# Altium PCB PCB1.PcbDoc (part 2 of 2)
Units mm, origin at the board's own origin, x right, y up, seen from the top; angles counter-clockwise.
Board outline 195 x 95 mm, 2 copper layers (Top Layer, Bottom Layer), stack 1.571 mm thick; 477 components, 312 nets, 1623 pads, 26 vias.
Unrouted connection lines stored in the file: 1219.
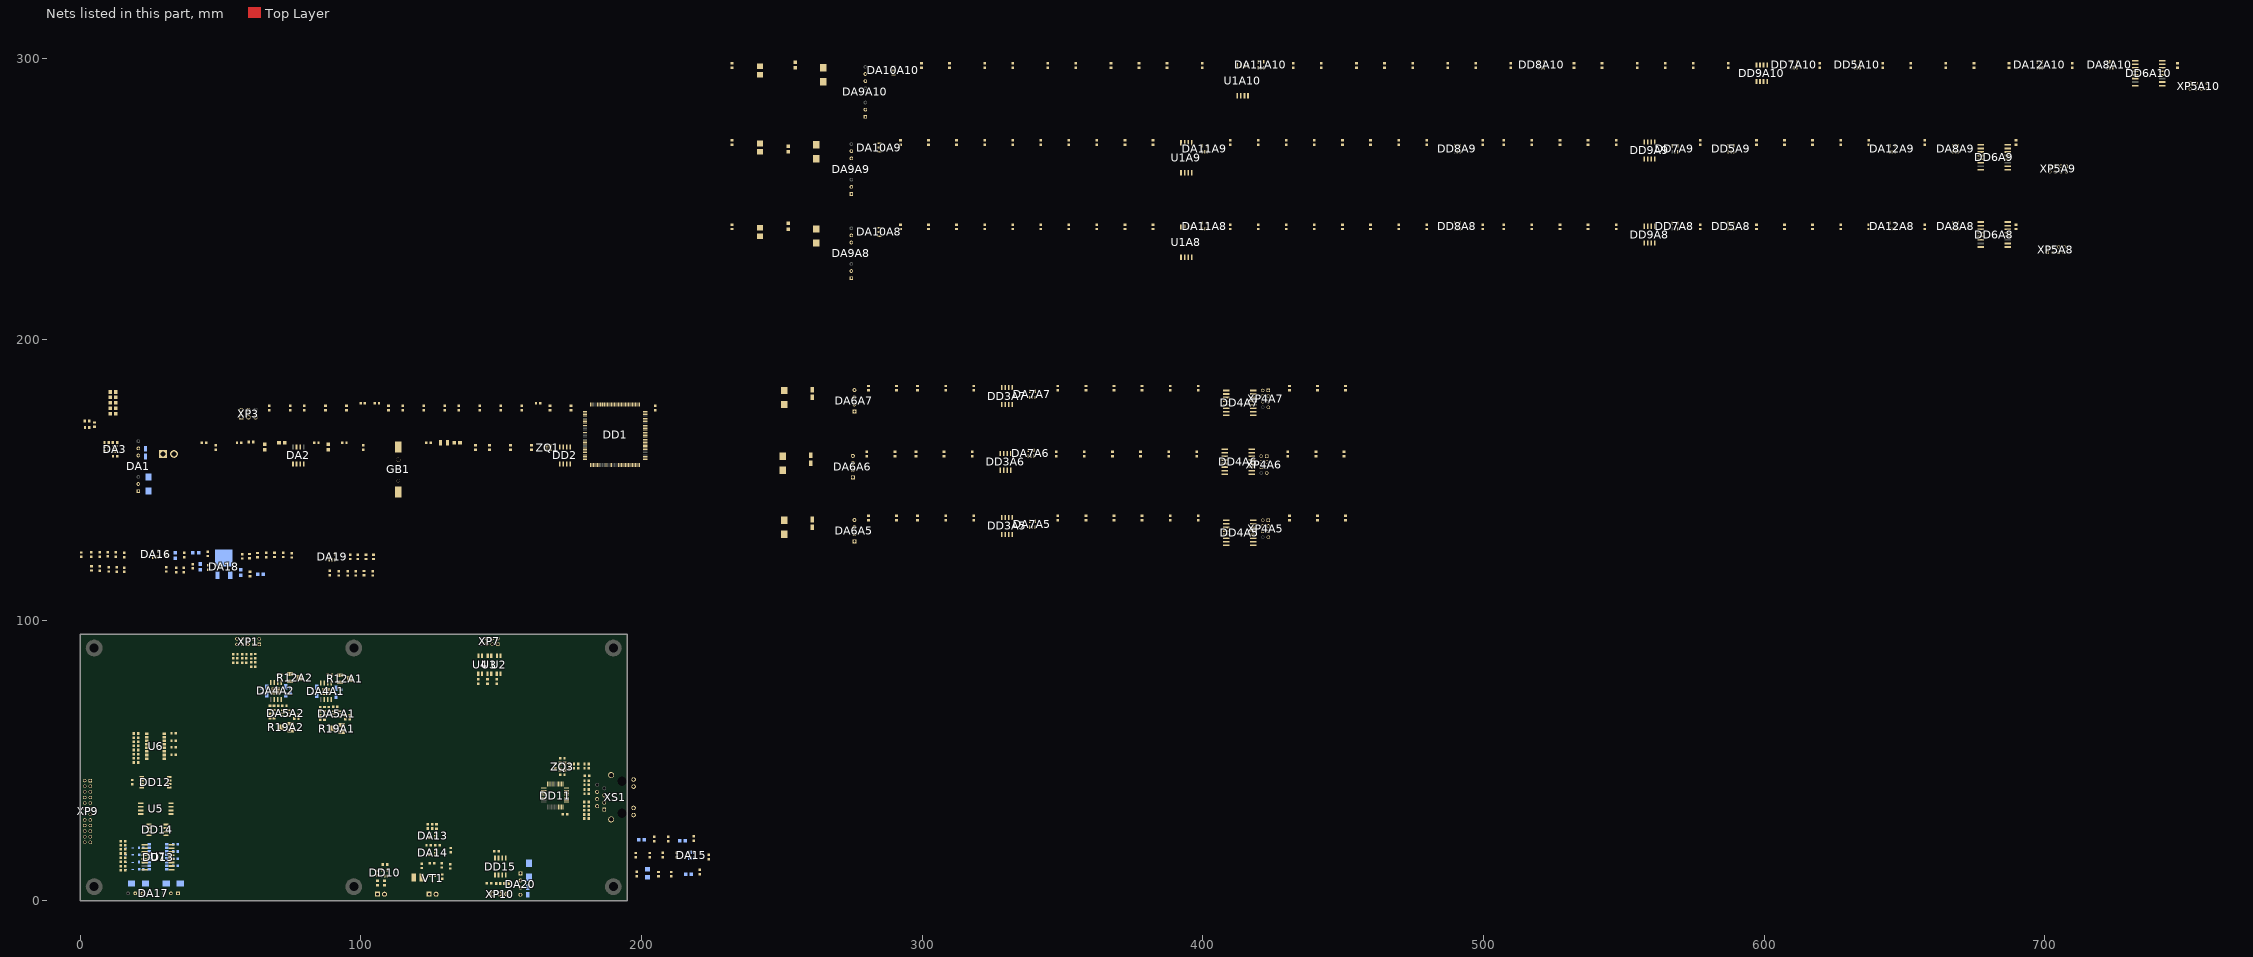
[diagram p2: the nets of this part, all layers, seen from the top]

## Part data
C1 C2 C35A1 C35A2 C38A1 C38A2 C44A5 C44A6 C44A7 C46A5 C46A6 C46A7 C52A8 C52A9 C52A10 C60A8 C60A9 C60A10 C110 C114 C119 C122: library part Capacitor_Polar
  C1 C44A5 C44A6 C44A7 C52A8 C52A9 C52A10 C110 C114 C119: Model="TECAP, 10 мкФ, 35 В, тип C, 10%"
  C2 C35A1 C35A2 C38A1 C38A2 C46A5 C46A6 C46A7 C122: Model="TECAP, 10 мкФ, 10 В, тип A, 10%"
  C60A8 C60A9 C60A10: Model="TECAP, 10 мкФ, 25 В, тип B, 10%"
C3 C4 C5 C6 C7 C8 C9 C11 C12 C13 C14 C15 C16 C18 C19 C20 C21 C22 C23 C24 C25 C26 C27 C28 C29 C30 C31 C32 C33 C34A1 C34A2 C36A1 C36A2 C37A1 C37A2 C39A1 C39A2 C40A1 C40A2 C41A1 C41A2 C42A1 C42A2 C43A3 C43A4 C45A5 C45A6 C45A7 C47A5 C47A6 C47A7 C48A5 C48A6 C48A7 C49A5 C49A6 C49A7 C50A5 C50A6 C50A7 C51A5 C51A6 C51A7 C53A8 C53A9 C53A10 C54A8 C54A9 C54A10 C55A8 C55A9 C55A10 C56A8 C56A9 C56A10 C57A8 C57A9 C57A10 C58A8 C58A9 C58A10 C59A8 C59A9 C59A10 C61A8 C61A9 C61A10 C62A8 C62A9 C62A10 C63A8 C63A9 C63A10 C64A8 C64A9 C64A10 C65A8 C65A9 C65A10 C66A8 C66A9 C66A10 C67A8 C67A9 C67A10 C68A8 C68A9 C68A10 C69A8 C69A9 C69A10 C70A8 C70A9 C70A10 C71A8 C71A9 C71A10 C72A8 C72A9 C72A10 C73A8 C73A9 C73A10 C74A8 C74A9 C74A10 C75 C76 C77 C78 C79 C80 C81 C83 C84 C85 C86 C88 C90 C91 C92 C93 C94 C95 C96 C97 C98 C99 C100 C101 C102 C103 C104 C105 C106 C107 C108 C109 C111 C112 C113 C115 C116 C117 C118 C120 C121 C123: library part Capacitor, Manufacturer=Murata
  C3 C4 C9 C12 C13 C14 C16 C19 C21 C22 C23 C24 C25 C26 C27 C28 C30 C31 C32 C33 C36A1 C36A2 C37A1 C37A2 C39A1 C39A2 C41A1 C41A2 C43A3 C43A4 C45A5 C45A6 C45A7 C47A5 C47A6 C47A7 C48A5 C48A6 C48A7 C50A5 C50A6 C50A7 C51A5 C51A6 C51A7 C53A8 C53A9 C53A10 C54A8 C54A9 C54A10 C55A8 C55A9 C55A10 C57A8 C57A9 C57A10 C61A8 C61A9 C61A10 C64A8 C64A9 C64A10 C65A8 C65A9 C65A10 C66A8 C66A9 C66A10 C67A8 C67A9 C67A10 C68A8 C68A9 C68A10 C70A8 C70A9 C70A10 C72A8 C72A9 C72A10 C73A8 C73A9 C73A10 C74A8 C74A9 C74A10 C76 C77 C80 C81 C83 C84 C85 C86 C88 C90 C91 C92 C93 C94 C95 C96 C97 C98 C100 C101 C102 C103 C105 C106 C108 C109 C112 C113 C116 C117 C118 C120 C121 C123: Model=GRM188R71H104KA93D
  C5 C6: Model=GRM188R6YA475KE15D
  C7 C58A8 C58A9 C58A10 C59A8 C59A9 C59A10 C75 C79 C115: Model=GRM188R61H105KAALD
  C8: Model=GRM188R61E106KA73D
  C11 C18: Model=GRM1885C1H180FA01D
  C15 C20 C29 C42A1 C42A2: Model=GRM188R61H225KE11D
  C34A1 C34A2 C40A1 C40A2: Model=GRM1885C1H220JA01D
  C49A5 C49A6 C49A7 C69A8 C69A9 C69A10: Model=GRM188R71H103JA01D
  C56A8 C56A9 C56A10 C62A8 C62A9 C62A10 C71A8 C71A9 C71A10 C78 C99 C104 C107: Model=GRM1885C1H101JA01D
  C63A8 C63A9 C63A10 C111: Model=GRM219R71H334KA88D
C10 C17 C82 C87 C89: library part Capacitor, Manufacturer=Yageo
  C10 C17 C87 C89: Model=CC0603CRNPO9BN8R0
  C82: Model=CC1206KKX7RDBB102
DA1 DA9A8 DA9A9 DA9A10: library part TMR3, Manufacturer="Traco Power"
  DA1: Model="TMR 6-2411"
  DA9A8 DA9A9 DA9A10: Model="TMR 2412"
DA2: library part LD1117D33, Manufacturer=STMicroelectronics, Model=LD1117D33CTR
DA3: library part LM27761, Manufacturer="Texas Instruments", Model=LM27761DSGR
DA4A1 DA4A2 DD12: Manufacturer="Analog Devices"
  DA4A1 DA4A2: Model=ADA4817-1ARDZ
  DD12: Model=ADM3050EBRIZ
DA5A1 DA5A2: library part TLV3501, Manufacturer="Texas Instruments", Model=TLV3501AIDBVR
DA6A5 DA6A6 DA6A7 DA20: library part TME, Manufacturer="Traco Power", Model="TME 2405S"
DA7A5 DA7A6 DA7A7 DA11A8 DA11A9 DA11A10 DA12A8 DA12A9 DA12A10 DA13 DA14 DA16: library part LMC7101, Manufacturer="Texas Instruments", Model=LMC7101BIM5
DA8A8 DA8A9 DA8A10: library part SN74LVC1G3157, Manufacturer="Texas Instruments", Model=SN74LVC1G3157DBV
DA10A8 DA10A9 DA10A10: library part LD2981ABU50TR, Manufacturer=STMicroelectronics, Model=L78L05ABUTR
DA15: library part TPD4S009, Manufacturer="Texas Instruments", Model=TPD4S009DBVR
DA17: library part TMR4, Manufacturer="Traco Power", Model="TMR 4-2415"
DA18: library part L78M, Manufacturer=STMicroelectronics, Model=L78M05CDT-TR
DA19: library part LM7301IM5, Manufacturer="Texas Instruments", Model=LM7301IM5X/NOPB
DD1: library part STM32F405ZG, Manufacturer=STMicroelectronics, Model=STM32F405ZGT6
DD2: library part W25Q, Manufacturer=Winbond, Model=W25Q16JVSNIQ
DD3A5 DD3A6 DD3A7 DD14 DD15: library part ADUM1100, Manufacturer="Analog Devices", Model=ADUM1100BR
DD4A5 DD4A6 DD4A7: library part ADUM1401, Manufacturer="Analog Devices", Model=ADUM1401CRW
DD5A8 DD5A9 DD5A10: library part SN74LVC1G08, Manufacturer="Texas Instruments", Model=SN74LVC1G08DBV
DD6A8 DD6A9 DD6A10 DD13: library part ADUM1400, Manufacturer="Analog Devices", Model=ADUM1400CRW
DD7A8 DD7A9 DD7A10 DD8A8 DD8A9 DD8A10 DD10: library part SN74LVC1G17, Manufacturer="Texas Instruments", Model=SN74LVC1G17DBV
DD9A8 DD9A9 DD9A10: library part ADUM1200, Manufacturer="Analog Devices", Model=ADUM1200CR
DD11: library part W5100S, Manufacturer=Wiznet, Model=W5100S-L
GB1: library part Accumulator, Manufacturer=Connfly, Model=DS1092-12-N8S
L1 L2 L3 L4 L5 L6 L7 L8: library part Inductor, Manufacturer=Murata, Model=BLM21PG221SN1D
R1 R2 R3 R4 R5 R6 R7 R8 R9 R10 R11 R13A1 R13A2 R15A1 R15A2 R16A1 R16A2 R17A1 R17A2 R18A1 R18A2 R20A3 R20A4 R21A3 R21A4 R22A5 R22A6 R22A7 R24A5 R24A6 R24A7 R25A5 R25A6 R25A7 R26A5 R26A6 R26A7 R27A5 R27A6 R27A7 R28A5 R28A6 R28A7 R29A5 R29A6 R29A7 R30A8 R30A9 R30A10 R31A8 R31A9 R31A10 R32A8 R32A9 R32A10 R33A8 R33A9 R33A10 R34A8 R34A9 R34A10 R35A8 R35A9 R35A10 R36A8 R36A9 R36A10 R37A8 R37A9 R37A10 R38A8 R38A9 R38A10 R39A8 R39A9 R39A10 R40A8 R40A9 R40A10 R41A8 R41A9 R41A10 R42A8 R42A9 R42A10 R43 R44 R45 R46 R47 R48 R49 R50 R51 R52 R53 R54 R55 R56 R57 R58 R59 R60 R61 R62 R63 R64 R65 R66 R67 R68 R69 R70 R71 R72 R73 R74 R75 R76 R77 R78 R79 R80 R81 R82 R83 R84 R85 R86 R87 R88 R89 R90 R91 R92 R93 R94 R95 R96 R97 R98 R99 R100 R101 R102 R103 R104 R105 R106 R107 R108 R113 R114 R115 R116 R117 R118 R119 R120 R121: library part Resistor, Manufacturer=Yageo
  R1 R2 R5 R113 R115: Model=RC0805FR-070RL
  R3: Model=RC0603FR-07133KL
  R4: Model=RT0603BRD0750KL
  R6 R10 R16A1 R16A2 R17A1 R17A2 R18A1 R18A2 R20A3 R20A4 R21A3 R21A4 R22A5 R22A6 R22A7 R24A5 R24A6 R24A7 R26A5 R26A6 R26A7 R27A5 R27A6 R27A7 R28A5 R28A6 R28A7 R29A5 R29A6 R29A7 R31A8 R31A9 R31A10 R32A8 R32A9 R32A10 R33A8 R33A9 R33A10 R34A8 R34A9 R34A10 R35A8 R35A9 R35A10 R36A8 R36A9 R36A10 R37A8 R37A9 R37A10 R38A8 R38A9 R38A10 R40A8 R40A9 R40A10 R42A8 R42A9 R42A10 R43 R44 R46 R48 R49 R55 R70 R71 R72 R73 R74 R75 R78 R79 R80 R81 R82 R83 R84 R89 R90 R91 R92 R93 R94 R95 R96 R99 R104 R114 R116 R117 R119 R120 R121: Model=RC0603FR-0710KL
  R7 R8 R9 R47 R51 R52 R53 R100 R101 R102 R103: Model=RC0603FR-07200RL
  R11 R13A1 R13A2 R69 R105 R106 R107 R108: Model=RC0603FR-070RL
  R15A1 R15A2: Model=RC0603FR-075K1L
  R25A5 R25A6 R25A7: Model=RC0603FR-072K4L
  R30A8 R30A9 R30A10: Model=RC0603FR-0715KL
  R39A8 R39A9 R39A10 R41A8 R41A9 R41A10 R97 R98: Model=RC0603FR-0716K5L
  R45 R68: Model=RC0603FR-0712KL
  R50: Model=RC1210FR-0710RL
  R54 R62 R65: Model=RC0603FR-071KL
  R56 R57 R58 R59: Model=RC0603FR-0749R9L
  R60 R61 R63 R64: Model=RC0603FR-073R3L
  R66: Model=RC0603FR-07300RL
  R67: Model=RC0603FR-071ML
  R76: Model=RC0603FR-0740K2L
  R77: Model=RC0603FR-07120RL
  R85 R86 R87 R88: Model=RC0603FR-07390RL
  R118: Model=RC0603FR-076K04L
R12A1 R12A2 R19A1 R19A2: library part Resistor_Variable, Manufacturer=Bourns
  R12A1 R12A2: Model=3224W-1-205E
  R19A1 R19A2: Model=3224W-1-103
R14A1 R14A2 R23A5 R23A6 R23A7 R109 R110 R111 R112: library part Resistor, Model=DNP
U1A8 U1A9 U1A10 U5: library part ACPL-C87, Manufacturer=Broadcom, Model=ACPL-C87A-500E
U2 U3 U4: library part TLP291, Manufacturer=Toshiba, Model=TLP291(GB-TP,SE
U6 U7: library part TLP281-4, Manufacturer=Toshiba, Model=TLP291-4
VD1 VD2 VD3: library part LED, Manufacturer=Kingbright
  VD1: Model=KP-2012MGC
  VD2: Model=KP-2012SYC
  VD3: Model=KP-2012EC
VD4 VD5 VD6 VD7: library part Diode_Zener, Manufacturer=Nexperia, Model=BZX384-C5V1
VT1: library part "MOSFET N-channel", Manufacturer=UMW, Model=AO3400A
XP1: library part Connector-10, Manufacturer=JST, Model=B10B-PHDSS
XP2 XP6 XP8: library part Connector-2, Manufacturer=JST
  XP2: Model=B2P-VH
  XP6 XP8: Model=B2B-EH-A
XP3: library part Connector-6, Manufacturer=Connfly, Model=PLD-6
XP4A5 XP4A6 XP4A7 XP5A8 XP5A9 XP5A10 XP7: library part Connector-8, Manufacturer=JST, Model=B8B-PHDSS
XP9: library part Connector-24, Manufacturer=JST, Model=B24B-PHDSS
XP10: library part Connector-3, Manufacturer=JST, Model=B3B-EH-A
XS1: Manufacturer=LINK-PP, Model=LPJD0012BENL
ZQ1: library part Quartz_Resonator_4-pin, Manufacturer=NDK, Model=NX2520SA-16MHZ-STD-CSW-5
ZQ2: library part Quartz_Resonator, Manufacturer=NDK, Model="NX3215SA- 32.768K-STD-MUA-8"
ZQ3: library part Quartz_Resonator_4-pin, Manufacturer=TXC, Model=7M-25.000MAAJ-T

## Free pads (board coordinates)
  round 6 hole 3.2: ""(5,5) ""(5,90) ""(97.5,5) ""(97.5,90) ""(190,5) ""(190,90)

## Via types
v1: diameter 0.6, hole 0.3, Top Layer to Bottom Layer, 26 vias

## Nets (pads, with @x,y where several pads share a name; then routed paths per layer and width w, separated by ;. In a path a pad name is that pad's centre, name@x,y a point inside that pad or via, vN(x,y) a via of type N, cw(c..) or ccw(c..) an arc to the next point about the centre after c; other vN are vias at no path point)
1V2A: C91.1 DD11.4 L5.2
1V2D: C90.1 C94.1 C96.1 C97.1 DD11.13 DD11.22 DD11.31 DD11.45 L4.2 L5.1
1V2O: C86.1 DD11.14 L4.1
+3.3V: C8.1 C9.1 C13.2 C21.2 C22.1 C23.1 C24.1 C26.2 C27.2 C28.2 C30.1 C31.2 C32.1 C33.1 C45A5.1 C45A6.1 C45A7.1 C47A5.1 C47A6.1 C47A7.1 C53A8.1 C53A9.1 C53A10.1 C54A8.1 C54A9.1 C54A10.1 C57A8.1 C57A9.1 C57A10.1 C73A8.1 C73A9.1 C73A10.1 C80.1 C83.1 C88.1 C93.1 C103.1 C106.1 C108.1 C123.1 DA2.2 DA2.3 DA2.6 DA2.7 DA8A8.5 DA8A9.5 DA8A10.5 DA15.5 DD1.17 DD1.30 DD1.39 DD1.52 DD1.62 DD1.72 DD1.84 DD1.95 DD1.108 DD1.121 DD1.131 DD1.144 DD2.3 DD2.7 DD2.8 DD3A5.1 DD3A5.3 DD3A6.1 DD3A6.3 DD3A7.1 DD3A7.3 DD4A5.10 DD4A5.16 DD4A6.10 DD4A6.16 DD4A7.10 DD4A7.16 DD5A8.5 DD5A9.5 DD5A10.5 DD6A8.1 DD6A9.1 DD6A10.1 DD9A8.8 DD9A9.8 DD9A10.8 DD10.5 DD11.24 DD11.36 DD12.1 DD13.10 DD13.16 DD14.1 DD14.3 DD15.8 L2.1 L6.1 R11.2 R22A5.1 R22A6.1 R22A7.1 R55.2 R70.2 R91.1 R92.1 R94.1 R96.1 XP3.1 XS1.9 XS1.11
+3.3VA: C12.2 C14.2 C16.1 C41A1.1 C41A2.1 C42A1.1 C42A2.1 DA5A1.4 DA5A2.4 DD1.32 DD1.33 L2.2 R19A1.3 R19A2.3 R20A3.1 R20A4.1
+3.3VA_ETH: C81.1 C92.1 C95.1 DD11.8 DD11.15 L6.2 XS1.2 XS1.5
+5V: C2.1 C4.2 C5.1 C76.1 C77.1 DA1.6 DA2.4 DA3.1 DA3.6 DA13.2 DA14.2 L1.1 XP6.1
+5V_DRVA8: C55A8.1 C64A8.1 C65A8.1 C66A8.1 C68A8.1 C70A8.1 C72A8.1 DA10A8.1 DA12A8.2 DD6A8.10 DD6A8.16 DD7A8.5 DD8A8.5 DD9A8.1 U1A8.1
+5V_DRVA9: C55A9.1 C64A9.1 C65A9.1 C66A9.1 C68A9.1 C70A9.1 C72A9.1 DA10A9.1 DA12A9.2 DD6A9.10 DD6A9.16 DD7A9.5 DD8A9.5 DD9A9.1 U1A9.1
+5V_DRVA10: C55A10.1 C64A10.1 C65A10.1 C66A10.1 C68A10.1 C70A10.1 C72A10.1 DA10A10.1 DA12A10.2 DD6A10.10 DD6A10.16 DD7A10.5 DD8A10.5 DD9A10.1 U1A10.1
+5V_FS: C120.1 C121.1 C122.1 DA20.4 DD15.1 DD15.3 XP10.2
+5V_HW: C100.1 C101.1 C112.1 C113.1 DA18.3 DD12.8 DD13.1 DD14.8 L7.1 R109.2 R110.2 R111.2 R112.2 XP9.1 XP9.2 XP9.8 XP9.10
+5V_PSA5: C46A5.1 C48A5.1 C50A5.1 C51A5.1 DA6A5.4 DA7A5.2 DD3A5.8 DD4A5.1 DD4A5.7 R27A5.1 R29A5.1
+5V_PSA6: C46A6.1 C48A6.1 C50A6.1 C51A6.1 DA6A6.4 DA7A6.2 DD3A6.8 DD4A6.1 DD4A6.7 R27A6.1 R29A6.1
+5V_PSA7: C46A7.1 C48A7.1 C50A7.1 C51A7.1 DA6A7.4 DA7A7.2 DD3A7.8 DD4A7.1 DD4A7.7 R27A7.1 R29A7.1
+5VA: C3.1 C37A1.1 C37A2.1 C38A1.1 C38A2.1 C61A8.1 C61A9.1 C61A10.1 C67A8.1 C67A9.1 C67A10.1 C102.1 C105.1 DA4A1.7 DA4A1.8 DA4A2.7 DA4A2.8 DA11A8.2 DA11A9.2 DA11A10.2 DA16.2 L1.2 U1A8.8 U1A9.8 U1A10.8 U5.8
+5VA_HW: C98.1 C117.1 L7.2 U5.1
+12V_DRVA8: C60A8.1 C63A8.2 DA9A8.6 DA10A8.3 XP5A8.1
+12V_DRVA9: C60A9.1 C63A9.2 DA9A9.6 DA10A9.3 XP5A9.1
+12V_DRVA10: C60A10.1 C63A10.2 DA9A10.6 DA10A10.3 XP5A10.1
+24V: C1.1 C44A5.1 C44A6.1 C44A7.1 C52A8.1 C52A9.1 C52A10.1 C110.1 C119.1 DA1.2 DA6A5.2 DA6A6.2 DA6A7.2 DA9A8.2 DA9A9.2 DA9A10.2 DA17.2 DA20.2 XP2.1 XP7.1 XP7.3 XP7.5
+24V_HW: C111.2 C114.1 DA17.6 DA18.1 L8.1 R105.2 R106.2 R107.2 R108.2
+24VA_HW: C116.1 C118.1 DA19.5 L8.2
+VBAT: DD1.6 GB1.2
-5VA: C19.1 C35A1.2 C35A2.2 C36A1.1 C36A2.1 DA4A1.4 DA4A2.4 L3.2 R13A1.1 R13A2.1
ACTn: DD11.20 R62.2
AGND: C3.2 C12.1 C14.1 C16.2 C19.2 C35A1.1 C35A2.1 C36A1.2 C36A2.2 C37A1.2 C37A2.2 C38A1.2 C38A2.2 C39A1.2 C39A2.2 C40A1.2 C40A2.2 C41A1.2 C41A2.2 C42A1.2 C42A2.2 C43A3.2 C43A4.2 C61A8.2 C61A9.2 C61A10.2 C62A8.2 C62A9.2 C62A10.2 C67A8.2 C67A9.2 C67A10.2 C74A8.2 C74A9.2 C74A10.2 C102.2 C104.2 C105.2 C109.2 DA4A1.3 DA4A1.EPAD DA4A2.3 DA4A2.EPAD DA5A1.2 DA5A1.6 DA5A2.2 DA5A2.6 DA11A8.5 DA11A9.5 DA11A10.5 DA16.5 DD1.31 R1.2 R2.2 R5.2 R14A1.2 R14A2.2 R16A1.2 R16A2.2 R19A1.1 R19A2.1 R39A8.2 R39A9.2 R39A10.2 R97.2 U1A8.5 U1A9.5 U1A10.5 U5.5 XP1.3 XP1.6 XP1.8 XP1.10
  other v1: 86.55,73.8 87.25,73.8 87.95,73.8 88.65,73.8 68.725,73.925 69.425,73.925 70.125,73.925 70.825,73.925 86.55,74.6 87.25,74.6 87.95,74.6 88.65,74.6 68.725,74.725 69.425,74.725 70.125,74.725 70.825,74.725 86.55,75.4 87.25,75.4 87.95,75.4 88.65,75.4 68.725,75.525 69.425,75.525 70.125,75.525 70.825,75.525
AGND_HW: C98.2 C99.1 C115.2 C116.2 C117.2 C118.2 DA19.2 R73.2 R81.2 R113.2 R114.1 R115.2 U5.3 U5.4 XP9.14
AN_MOD_HW: R73.1 R76.2 XP9.12
CANH_HW: DD12.7 R77.2 XP9.6
CANL_HW: DD12.6 R77.1 XP9.5
COM1_HW: R75.2 R83.1 XP9.17
COM2_HW: R79.2 R90.1 XP9.18
COM3_HW: R82.2 R84.1 XP9.21
CRASH_IND: DD1.3 R53.2
DIG_MOD_HW: R72.2 R89.1 XP9.15
DRV1_ADC: C74A8.1 DD1.40 R42A8.2
DRV1_AN_MOD: DD1.100 DD6A8.5
DRV1_DIG_MOD: DA8A8.3 DD1.96 DD5A8.1
DRV1_ERR1: DD1.82 DD9A8.7
DRV1_ERR2: DD1.85 DD9A8.6
DRV1_ON: DD1.80 DD6A8.3 R36A8.2
DRV1_SEL_DIG: DA8A8.6 DD1.81
DRV2_ADC: C74A9.1 DD1.41 R42A9.2
DRV2_AN_MOD: DD1.101 DD6A9.5
DRV2_DIG_MOD: DA8A9.3 DD1.97 DD5A9.1
DRV2_ERR1: DD1.88 DD9A9.7
DRV2_ERR2: DD1.89 DD9A9.6
DRV2_ON: DD1.86 DD6A9.3 R36A9.2
DRV2_SEL_DIG: DA8A9.6 DD1.87
DRV3_ADC: C74A10.1 DD1.42 R42A10.2
DRV3_AN_MOD: DD1.102 DD6A10.5
DRV3_DIG_MOD: DA8A10.3 DD1.98 DD5A10.1
DRV3_ERR1: DD1.92 DD9A10.7
DRV3_ERR2: DD1.93 DD9A10.6
DRV3_ON: DD1.90 DD6A10.3 R36A10.2
DRV3_SEL_DIG: DA8A10.6 DD1.91
EMIS_IND: DD1.2 R52.2
ETH_CS: DD1.110 DD11.29
ETH_INT: DD1.115 DD11.47
ETH_MISO: DD1.112 DD11.33
ETH_MOSI: DD1.113 DD11.32
ETH_RST: DD1.114 DD11.48 R70.1
ETH_SCLK: DD1.111 DD11.30
EXT_AN_MOD: C109.1 DD1.43 R99.2
EXT_COM1: DD1.63 DD13.13
EXT_COM2: DD1.64 DD13.12
EXT_COM3: DD1.65 DD13.11
EXT_DIG_MOD: DD1.75 DD5A8.2 DD5A9.2 DD5A10.2 DD13.14
EXT_FLAG1: DD1.66 R100.2
EXT_FLAG2: DD1.67 R101.2
EXT_FLAG3: DD1.68 R102.2
EXT_FLAG4: DD1.69 R103.2
EXT_IL1: DD1.57 R91.2 U6.16
EXT_IL2: DD1.58 R92.2 U6.14
EXT_KEY: DD1.59 R94.2 U6.12
EXT_MP_EN: DD1.60 R96.2 U6.10
EXT_PMO: DD1.70 DD14.2
EXT_RxCAN: DD1.73 DD12.3
EXT_TxCAN: DD1.74 DD12.2
FIBER_IL: DD1.5 DD10.4
FLAG1_HW: R116.2 U7.15 XP9.19
FLAG2_HW: R117.2 U7.13 XP9.22
FLAG3_HW: R119.2 U7.11 XP9.23
FLAG4_HW: R120.2 U7.9 XP9.24
FLOW: DD1.4 DD15.6
GND: C2.2 C4.1 C5.2 C6.2 C8.2 C9.2 C10.2 C11.2 C13.1 C15.2 C17.2 C18.2 C20.2 C21.1 C22.2 C23.2 C24.2 C25.2 C26.1 C27.1 C28.1 C29.2 C30.2 C31.1 C32.2 C33.2 C45A5.2 C45A6.2 C45A7.2 C47A5.2 C47A6.2 C47A7.2 C53A8.2 C53A9.2 C53A10.2 C54A8.2 C54A9.2 C54A10.2 C57A8.2 C57A9.2 C57A10.2 C73A8.2 C73A9.2 C73A10.2 C75.2 C76.2 C77.2 C79.2 C80.2 C81.2 C82.2 C83.2 C84.2 C85.2 C86.2 C87.2 C88.2 C89.2 C90.2 C91.2 C92.2 C93.2 C94.2 C95.2 C96.2 C97.2 C103.2 C106.2 C108.2 C123.2 DA1.7 DA2.1 DA3.2 DA3.9 DA8A8.2 DA8A9.2 DA8A10.2 DA13.5 DA14.5 DA15.2 DD1.16 DD1.38 DD1.51 DD1.61 DD1.83 DD1.94 DD1.107 DD1.120 DD1.130 DD2.4 DD3A5.4 DD3A6.4 DD3A7.4 DD4A5.9 DD4A5.15 DD4A6.9 DD4A6.15 DD4A7.9 DD4A7.15 DD5A8.3 DD5A9.3 DD5A10.3 DD6A8.2 DD6A8.6 DD6A8.8 DD6A9.2 DD6A9.6 DD6A9.8 DD6A10.2 DD6A10.6 DD6A10.8 DD9A8.5 DD9A9.5 DD9A10.5 DD10.3 DD11.1 DD11.7 DD11.10 DD11.16 DD11.23 DD11.25 DD11.26 DD11.27 DD11.28 DD11.46 DD12.4 DD13.9 DD13.15 DD14.4 DD15.5 DD15.7 GB1.1 R1.1 R2.1 R4.1 R5.1 R6.2 R10.2 R23A5.1 R23A6.1 R23A7.1 R36A8.1 R36A9.1 R36A10.1 R43.1 R46.2 R49.1 R50.1 R66.1 U2.2 U3.2 U4.2 U6.9 U6.11 U6.13 U6.15 U7.2 U7.4 U7.6 U7.8 VD1.2 VD2.2 VD3.2 XP3.3 XP8.2 ZQ1.2 ZQ1.4 ZQ3.2 ZQ3.4
  other v1: 11.875,160.9 12.875,160.9
GND_24V: C1.2 C44A5.2 C44A6.2 C44A7.2 C52A8.2 C52A9.2 C52A10.2 C110.2 C119.2 DA1.1 DA6A5.1 DA6A6.1 DA6A7.1 DA9A8.1 DA9A9.1 DA9A10.1 DA17.1 DA20.1 U2.3 U3.3 U4.3 XP2.2
GND_DRVA8: C55A8.2 C56A8.1 C58A8.2 C59A8.2 C60A8.2 C63A8.1 C64A8.2 C65A8.2 C66A8.2 C68A8.2 C69A8.2 C70A8.2 C72A8.2 DA9A8.7 DA10A8.2 DA12A8.5 DD6A8.9 DD6A8.15 DD7A8.3 DD8A8.3 DD9A8.4 R31A8.2 R32A8.1 R33A8.1 U1A8.3 U1A8.4 XP5A8.2
GND_DRVA9: C55A9.2 C56A9.1 C58A9.2 C59A9.2 C60A9.2 C63A9.1 C64A9.2 C65A9.2 C66A9.2 C68A9.2 C69A9.2 C70A9.2 C72A9.2 DA9A9.7 DA10A9.2 DA12A9.5 DD6A9.9 DD6A9.15 DD7A9.3 DD8A9.3 DD9A9.4 R31A9.2 R32A9.1 R33A9.1 U1A9.3 U1A9.4 XP5A9.2
GND_DRVA10: C55A10.2 C56A10.1 C58A10.2 C59A10.2 C60A10.2 C63A10.1 C64A10.2 C65A10.2 C66A10.2 C68A10.2 C69A10.2 C70A10.2 C72A10.2 DA9A10.7 DA10A10.2 DA12A10.5 DD6A10.9 DD6A10.15 DD7A10.3 DD8A10.3 DD9A10.4 R31A10.2 R32A10.1 R33A10.1 U1A10.3 U1A10.4 XP5A10.2
GND_FS: C120.2 C121.2 C122.2 DA20.3 DD15.4 R121.2 XP10.3
GND_HW: C100.2 C101.2 C111.1 C112.2 C113.2 C114.2 DA17.7 DA18.2 DD12.5 DD13.2 DD13.8 DD14.5 DD14.7 R71.1 R72.1 R74.1 R75.1 R78.1 R79.1 R80.1 R82.1 R113.1 R115.1 R116.1 R117.1 R119.1 R120.1 U6.2 U6.4 U6.6 U6.8 VD4.2 VD5.2 VD6.2 VD7.2 XP9.7 XP9.16 XP9.20
GND_PSA5: C46A5.2 C48A5.2 C49A5.2 C50A5.2 C51A5.2 DA6A5.3 DA7A5.5 DD3A5.5 DD3A5.7 DD4A5.2 DD4A5.8 R26A5.1 R28A5.2 XP4A5.5 XP4A5.7
GND_PSA6: C46A6.2 C48A6.2 C49A6.2 C50A6.2 C51A6.2 DA6A6.3 DA7A6.5 DD3A6.5 DD3A6.7 DD4A6.2 DD4A6.8 R26A6.1 R28A6.2 XP4A6.5 XP4A6.7
GND_PSA7: C46A7.2 C48A7.2 C49A7.2 C50A7.2 C51A7.2 DA6A7.3 DA7A7.5 DD3A7.5 DD3A7.7 DD4A7.2 DD4A7.8 R26A7.1 R28A7.2 XP4A7.5 XP4A7.7
GUIDE_LAS: DD1.21 R43.2 R44.1
IL1_HW: R71.2 R85.1 XP9.4
IL2_HW: R74.2 R86.1 XP9.3
KEY_HW: R78.2 R87.1 XP9.9
LED1: DD1.10 R7.1
LED2: DD1.11 R8.1
LED3: DD1.12 R9.1
LNKn: DD11.17 R65.2
MEM_CS: DD1.132 DD2.1
MEM_MISO: DD1.134 DD2.2
MEM_MOSI: DD1.135 DD2.5
MEM_SCLK: DD1.133 DD2.6
MP_EN_HW: R80.2 R88.1 XP9.11
NetC6_1: C6.1 DA3.3
NetC7_1: C7.1 DA3.8
NetC7_2: C7.2 DA3.7
NetC15_1: C15.1 DA3.4 L3.1 R3.2
NetC20_1: C20.1 DD1.71
NetC29_1: C29.1 DD1.106
NetC34A1_1: C34A1.1 DA4A1.1 R12A1.2 R12A1.3
NetC34A2_1: C34A2.1 DA4A2.1 R12A2.2 R12A2.3
NetC40A1_1: C40A1.1 DA5A1.1 R18A1.2
NetC40A2_1: C40A2.1 DA5A2.1 R18A2.2
NetC49A5_1: C49A5.1 DA7A5.3 R24A5.2
NetC49A6_1: C49A6.1 DA7A6.3 R24A6.2
NetC49A7_1: C49A7.1 DA7A7.3 R24A7.2
NetC56A8_2: C56A8.2 R30A8.1 R31A8.1 U1A8.2
NetC56A9_2: C56A9.2 R30A9.1 R31A9.1 U1A9.2
NetC56A10_2: C56A10.2 R30A10.1 R31A10.1 U1A10.2
NetC58A8_1: C58A8.1 DD7A8.2 R34A8.2
NetC58A9_1: C58A9.1 DD7A9.2 R34A9.2
NetC58A10_1: C58A10.1 DD7A10.2 R34A10.2
NetC59A8_1: C59A8.1 DD8A8.2 R35A8.2
NetC59A9_1: C59A9.1 DD8A9.2 R35A9.2
NetC59A10_1: C59A10.1 DD8A10.2 R35A10.2
NetC62A8_1: C62A8.1 DA11A8.3 R37A8.2 R39A8.1
NetC62A9_1: C62A9.1 DA11A9.3 R37A9.2 R39A9.1
NetC62A10_1: C62A10.1 DA11A10.3 R37A10.2 R39A10.1
NetC69A8_1: C69A8.1 DA12A8.3 R40A8.2
NetC69A9_1: C69A9.1 DA12A9.3 R40A9.2
NetC69A10_1: C69A10.1 DA12A10.3 R40A10.2
NetC71A8_1: C71A8.1 DA11A8.4 R38A8.2 R41A8.2
NetC71A8_2: C71A8.2 DA11A8.1 R41A8.1 R42A8.1
NetC71A9_1: C71A9.1 DA11A9.4 R38A9.2 R41A9.2
NetC71A9_2: C71A9.2 DA11A9.1 R41A9.1 R42A9.1
NetC71A10_1: C71A10.1 DA11A10.4 R38A10.2 R41A10.2
NetC71A10_2: C71A10.2 DA11A10.1 R41A10.1 R42A10.1
NetC75_1: C75.1 DA13.3 R44.2
NetC78_1: C78.1 DA14.1 R47.1
NetC78_2: C78.2 DA14.4 R48.1
NetC79_1: C79.1 DD10.2 R54.2 R55.1
NetC82_1: C82.1 XS1.13 XS1.14
NetC84_1: C84.1 R56.2 R57.2
NetC85_1: C85.1 R58.2 R59.2
NetC89_1: C89.1 R69.2 ZQ3.3
NetC99_2: C99.2 R76.1 R81.1 U5.2
NetC104_1: C104.1 DA16.3 R93.2 R97.1
NetC107_1: C107.1 DA16.4 R95.2 R98.2
NetC107_2: C107.2 DA16.1 R98.1 R99.1
NetC115_1: C115.1 DA19.3 R104.2
NetDA3_5: DA3.5 R3.1 R4.2
NetDA4A1_6: DA4A1.6 R15A1.1
NetDA4A2_6: DA4A2.6 R15A2.1
NetDA5A1_3: DA5A1.3 R19A1.2
NetDA5A2_3: DA5A2.3 R19A2.2
NetDA7A5_1: DA7A5.1 DA7A5.4 XP4A5.6
NetDA7A6_1: DA7A6.1 DA7A6.4 XP4A6.6
NetDA7A7_1: DA7A7.1 DA7A7.4 XP4A7.6
NetDA8A8_1: DA8A8.1 DD5A8.4
NetDA8A8_4: DA8A8.4 DD6A8.4
NetDA8A9_1: DA8A9.1 DD5A9.4
NetDA8A9_4: DA8A9.4 DD6A9.4
NetDA8A10_1: DA8A10.1 DD5A10.4
NetDA8A10_4: DA8A10.4 DD6A10.4
NetDA12A8_1: DA12A8.1 DA12A8.4 XP5A8.5
NetDA12A9_1: DA12A9.1 DA12A9.4 XP5A9.5
NetDA12A10_1: DA12A10.1 DA12A10.4 XP5A10.5
NetDA13_1: DA13.1 DA13.4 R45.1
NetDA14_3: DA14.3 R45.2 R46.1
NetDA19_4: DA19.4 R114.2 R118.1
NetDD1_48: DD1.48 R6.1
NetDD1_138: DD1.138 R10.1
NetDD1_143: DD1.143 R11.1
NetDD3A5_6: DD3A5.6 R24A5.1
NetDD3A6_6: DD3A6.6 R24A6.1
NetDD3A7_6: DD3A7.6 R24A7.1
NetDD4A5_3: DD4A5.3 R26A5.2 XP4A5.1
NetDD4A5_4: DD4A5.4 R27A5.2 XP4A5.2
NetDD4A5_5: DD4A5.5 R29A5.2 XP4A5.3
NetDD4A5_6: DD4A5.6 R25A5.2
NetDD4A6_3: DD4A6.3 R26A6.2 XP4A6.1
NetDD4A6_4: DD4A6.4 R27A6.2 XP4A6.2
NetDD4A6_5: DD4A6.5 R29A6.2 XP4A6.3
NetDD4A6_6: DD4A6.6 R25A6.2
NetDD4A7_3: DD4A7.3 R26A7.2 XP4A7.1
NetDD4A7_4: DD4A7.4 R27A7.2 XP4A7.2
NetDD4A7_5: DD4A7.5 R29A7.2 XP4A7.3
NetDD4A7_6: DD4A7.6 R25A7.2
NetDD6A8_12: DD6A8.12 R40A8.1
NetDD6A8_13: DD6A8.13 XP5A8.4
NetDD6A8_14: DD6A8.14 XP5A8.3
NetDD6A9_12: DD6A9.12 R40A9.1
NetDD6A9_13: DD6A9.13 XP5A9.4
NetDD6A9_14: DD6A9.14 XP5A9.3
NetDD6A10_12: DD6A10.12 R40A10.1
NetDD6A10_13: DD6A10.13 XP5A10.4
NetDD6A10_14: DD6A10.14 XP5A10.3
NetDD7A8_4: DD7A8.4 DD9A8.2
NetDD7A9_4: DD7A9.4 DD9A9.2
NetDD7A10_4: DD7A10.4 DD9A10.2
NetDD8A8_4: DD8A8.4 DD9A8.3
NetDD8A9_4: DD8A9.4 DD9A9.3
NetDD8A10_4: DD8A10.4 DD9A10.3
NetDD11_9: DD11.9 R68.2
NetDD13_3: DD13.3 R89.2 VD7.1
NetDD13_4: DD13.4 R83.2 VD6.1
NetDD13_5: DD13.5 R90.2 VD5.1
NetDD13_6: DD13.6 R84.2 VD4.1
NetDD14_6: DD14.6 R104.1
NetDD15_2: DD15.2 R121.1 XP10.1
NetR7_2: R7.2 VD1.1
NetR8_2: R8.2 VD2.1
NetR9_2: R9.2 VD3.1
NetR15A1_2: R15A1.2 R16A1.1 R17A1.1 R18A1.1
NetR15A2_2: R15A2.2 R16A2.1 R17A2.1 R18A2.1
NetR25A5_1: R25A5.1 R28A5.1 XP4A5.4
NetR25A6_1: R25A6.1 R28A6.1 XP4A6.4
NetR25A7_1: R25A7.1 R28A7.1 XP4A7.4
NetR30A8_2: R30A8.2 XP5A8.7
NetR30A9_2: R30A9.2 XP5A9.7
NetR30A10_2: R30A10.2 XP5A10.7
NetR32A8_2: R32A8.2 R34A8.1 XP5A8.6
NetR32A9_2: R32A9.2 R34A9.1 XP5A9.6
NetR32A10_2: R32A10.2 R34A10.1 XP5A10.6
NetR33A8_2: R33A8.2 R35A8.1 XP5A8.8
NetR33A9_2: R33A9.2 R35A9.1 XP5A9.8
NetR33A10_2: R33A10.2 R35A10.1 XP5A10.8
NetR37A8_1: R37A8.1 U1A8.7
NetR37A9_1: R37A9.1 U1A9.7
NetR37A10_1: R37A10.1 U1A10.7
NetR38A8_1: R38A8.1 U1A8.6
NetR38A9_1: R38A9.1 U1A9.6
NetR38A10_1: R38A10.1 U1A10.6
NetR47_2: R47.2 R49.2 VT1.1
NetR48_2: R48.2 R50.2 VT1.2
NetR51_1: R51.1 U2.1
NetR52_1: R52.1 U3.1
NetR53_1: R53.1 U4.1
NetR54_1: R54.1 XP8.1
NetR62_1: R62.1 XS1.10
NetR65_1: R65.1 XS1.12
NetR66_2: R66.2 R68.1
NetR85_2: R85.2 U6.1
NetR86_2: R86.2 U6.3
NetR87_2: R87.2 U6.5
NetR88_2: R88.2 U6.7
NetR93_1: R93.1 U5.7
NetR95_1: R95.1 U5.6
NetR100_1: R100.1 U7.1
NetR101_1: R101.1 U7.3
NetR102_1: R102.1 U7.5
NetR103_1: R103.1 U7.7
NetR105_1: R105.1 R109.1 U7.16
NetR106_1: R106.1 R110.1 U7.14
NetR107_1: R107.1 R111.1 U7.12
NetR108_1: R108.1 R112.1 U7.10
NetU2_4: U2.4 XP7.2
NetU3_4: U3.4 XP7.4
NetU4_4: U4.4 XP7.6
NetVT1_3: VT1.3 XP6.2
NRST: C25.1 DD1.25 XP3.5
OSC32_IN: C18.1 DD1.8 ZQ2.2
OSC32_OUT: C11.1 DD1.9 ZQ2.1
OSC_IN: C17.1 DD1.23 ZQ1.3
OSC_OUT: C10.1 DD1.24 ZQ1.1
PD1_A: R13A1.2 R14A1.1 XP1.2
PD1_ADC: C39A1.1 DD1.34 R17A1.2
PD1_C: C34A1.2 DA4A1.2 R12A1.1 XP1.1
PD1_ERR: DA5A1.5 DD1.28
PD2_A: R13A2.2 R14A2.1 XP1.5
PD2_ADC: C39A2.1 DD1.35 R17A2.2
PD2_C: C34A2.2 DA4A2.2 R12A2.1 XP1.4
PD2_ERR: DA5A2.5 DD1.29
PMO_HW: DA19.1 R118.2 XP9.13
POWER_IND: DD1.1 R51.2
PS1_ERR1: DD1.117 DD4A5.14
PS1_ERR2: DD1.118 DD4A5.13
PS1_ERR3: DD1.119 DD4A5.12
PS1_ON: DD1.116 DD4A5.11 R22A5.2 R23A5.2
PS1_PV: DD1.136 DD3A5.2
PS2_ERR1: DD1.123 DD4A6.14
PS2_ERR2: DD1.124 DD4A6.13
PS2_ERR3: DD1.125 DD4A6.12
PS2_ON: DD1.122 DD4A6.11 R22A6.2 R23A6.2
PS2_PV: DD1.137 DD3A6.2
PS3_ERR1: DD1.127 DD4A7.14
PS3_ERR2: DD1.128 DD4A7.13
PS3_ERR3: DD1.129 DD4A7.12
PS3_ON: DD1.126 DD4A7.11 R22A7.2 R23A7.2
PS3_PV: DD1.139 DD3A7.2
RD_N: DA15.4 R58.1 R61.2 XS1.6
RD_P: DA15.3 R59.1 R64.2 XS1.4
RXI_N: DD11.5 R61.1
RXI_P: DD11.6 R64.1
SWCLK: DD1.109 XP3.2
SWDIO: DD1.105 XP3.4
T1: R20A3.2 R21A3.1 XP1.7
T1_ADC: C43A3.1 DD1.36 R21A3.2
T2: R20A4.2 R21A4.1 XP1.9
T2_ADC: C43A4.1 DD1.37 R21A4.2
TD_N: DA15.6 R56.1 R60.2 XS1.3
TD_P: DA15.1 R57.1 R63.2 XS1.1
TXO_N: DD11.2 R60.1
TXO_P: DD11.3 R63.1
XSCI: DD11.12 R67.2 R69.1
XSCO: C87.1 DD11.11 R67.1 ZQ3.1
pads on no net: DA1.3 DA1.5 DA1.8 DA2.5 DA2.8 DA4A1.5 DA4A2.5 DA9A8.3 DA9A8.5 DA9A8.8 DA9A9.3 DA9A9.5 DA9A9.8 DA9A10.3 DA9A10.5 DA9A10.8 DA17.3 DA17.5 DA17.8 DD1.7 DD1.13 DD1.14 DD1.15 DD1.18 DD1.19 DD1.20 DD1.22 DD1.26 DD1.27 DD1.44 DD1.45 DD1.46 DD1.47 DD1.49 DD1.50 DD1.53 DD1.54 DD1.55 DD1.56 DD1.76 DD1.77 DD1.78 DD1.79 DD1.99 DD1.103 DD1.104 DD1.140 DD1.141 DD1.142 DD6A8.7 DD6A8.11 DD6A9.7 DD6A9.11 DD6A10.7 DD6A10.11 DD7A8.1 DD7A9.1 DD7A10.1 DD8A8.1 DD8A9.1 DD8A10.1 DD10.1 DD11.18 DD11.19 DD11.21 DD11.34 DD11.35 DD11.37 DD11.38 DD11.39 DD11.40 DD11.41 DD11.42 DD11.43 DD11.44 DD13.7 XP3.6 XP4A5.8 XP4A6.8 XP4A7.8 XP7.7 XP7.8 XS1. XS1.7 XS1.8

## Silkscreen, mask and mechanical layers (free items; w line width, h text height)
Top Assy:
  circle w0.2: c97.5,90 r1.6
  circle w0.2: c97.5,5 r1.6
  circle w0.2: c5,90 r1.6
  circle w0.2: c190,90 r1.6
  circle w0.2: c190,5 r1.6
  circle w0.2: c5,5 r1.6
Bottom Assy:
  circle w0.2: c97.5,90 r1.6
  circle w0.2: c97.5,5 r1.6
  circle w0.2: c5,90 r1.6
  circle w0.2: c190,90 r1.6
  circle w0.2: c190,5 r1.6
  circle w0.2: c5,5 r1.6
Board Outline:
  lines w0.2: 0,0 0,95 195,95 195,0 95,0 0,0